# Altium PCB Relay-Driver-Board-v1.0.PcbDoc (part 1 of 3)
Units mil, origin at the board's own origin, x right, y up, seen from the top; angles counter-clockwise.
Board outline 3472 x 3047 mil, 4 copper layers (Top Layer, POWER, GND, Bottom Layer), stack 62.449 mil thick; 86 components, 50 nets, 261 pads, 281 vias.
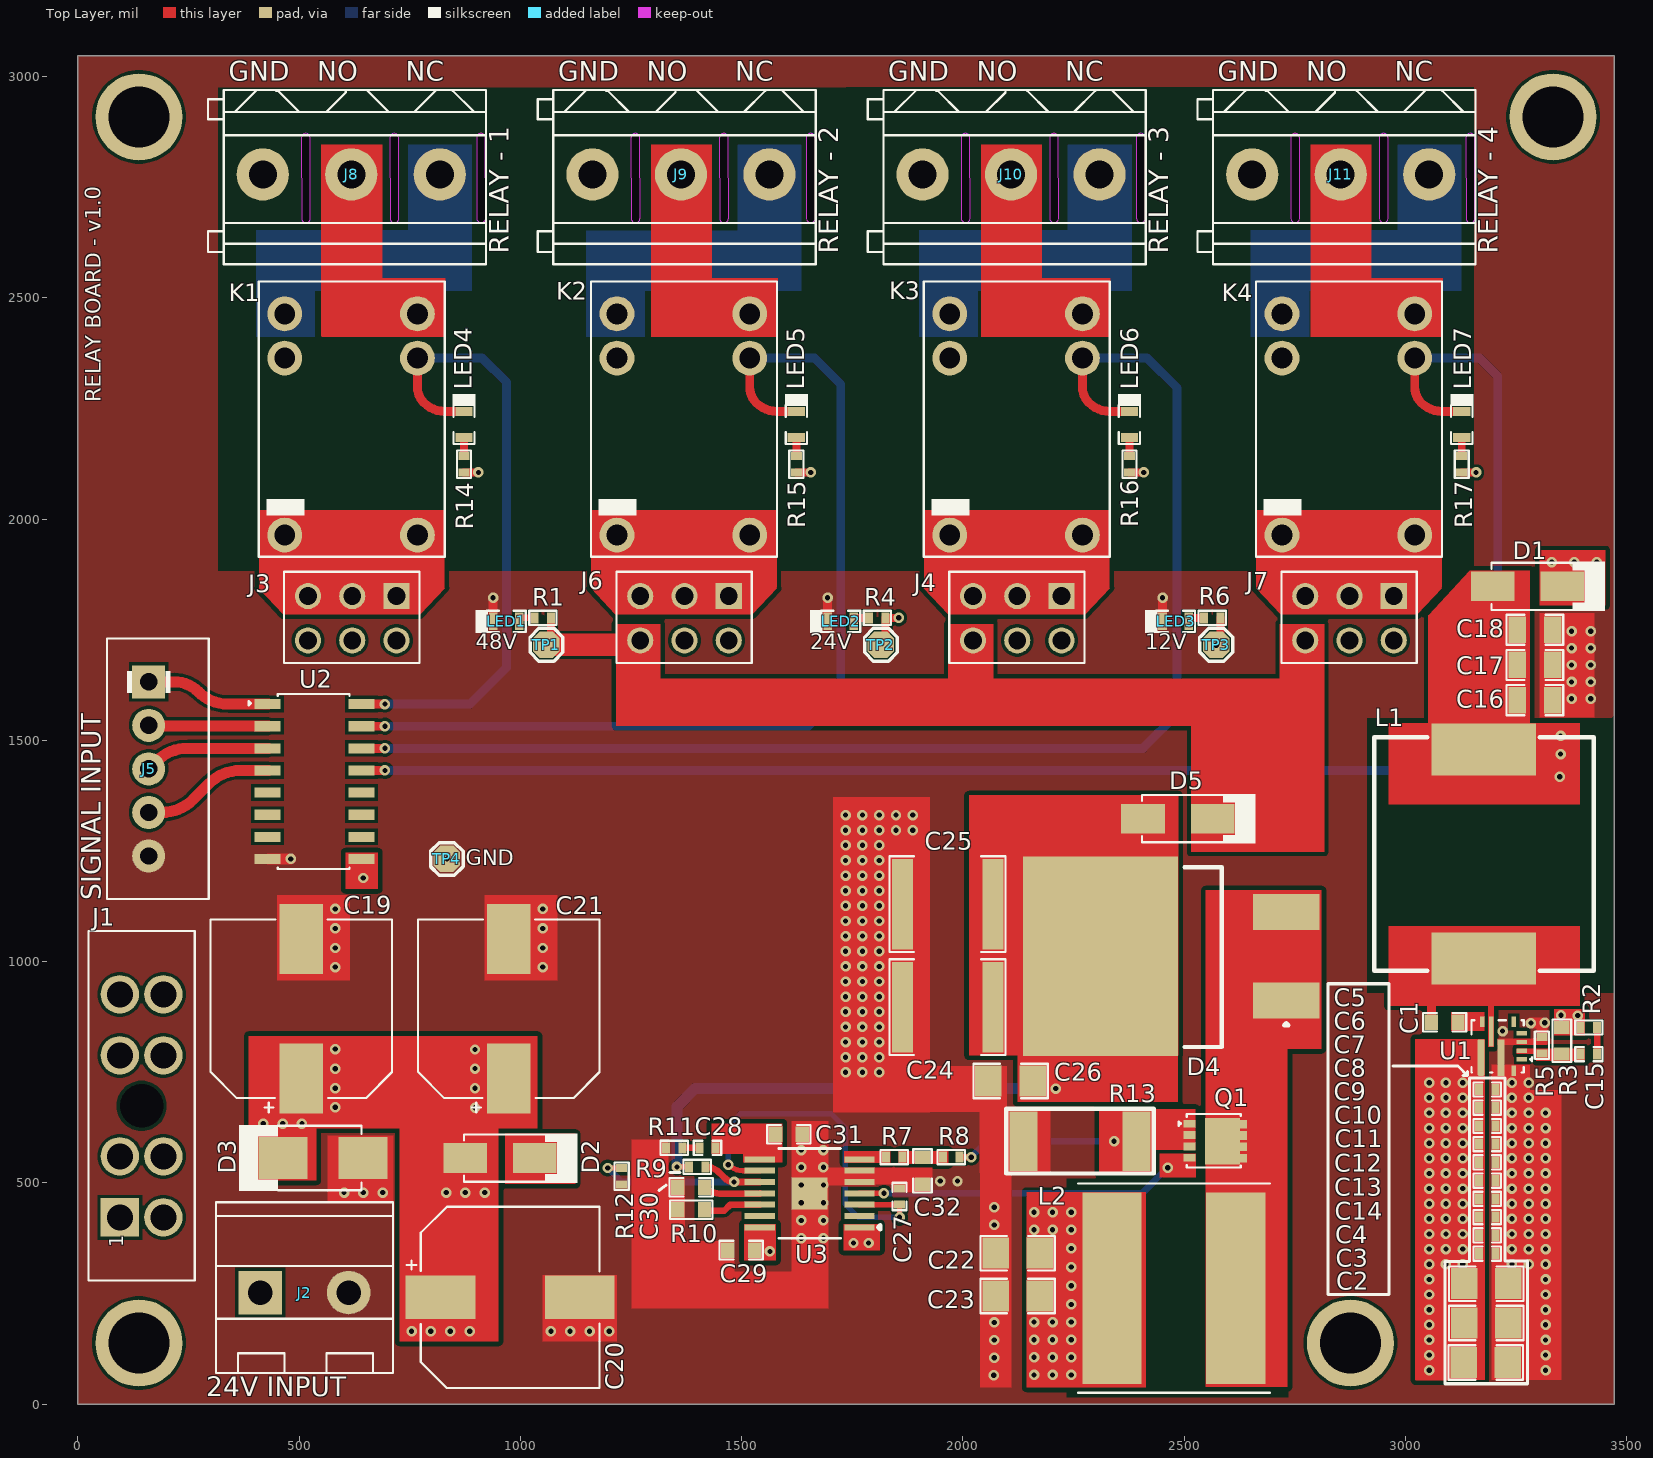
[diagram p0: Top Layer view]
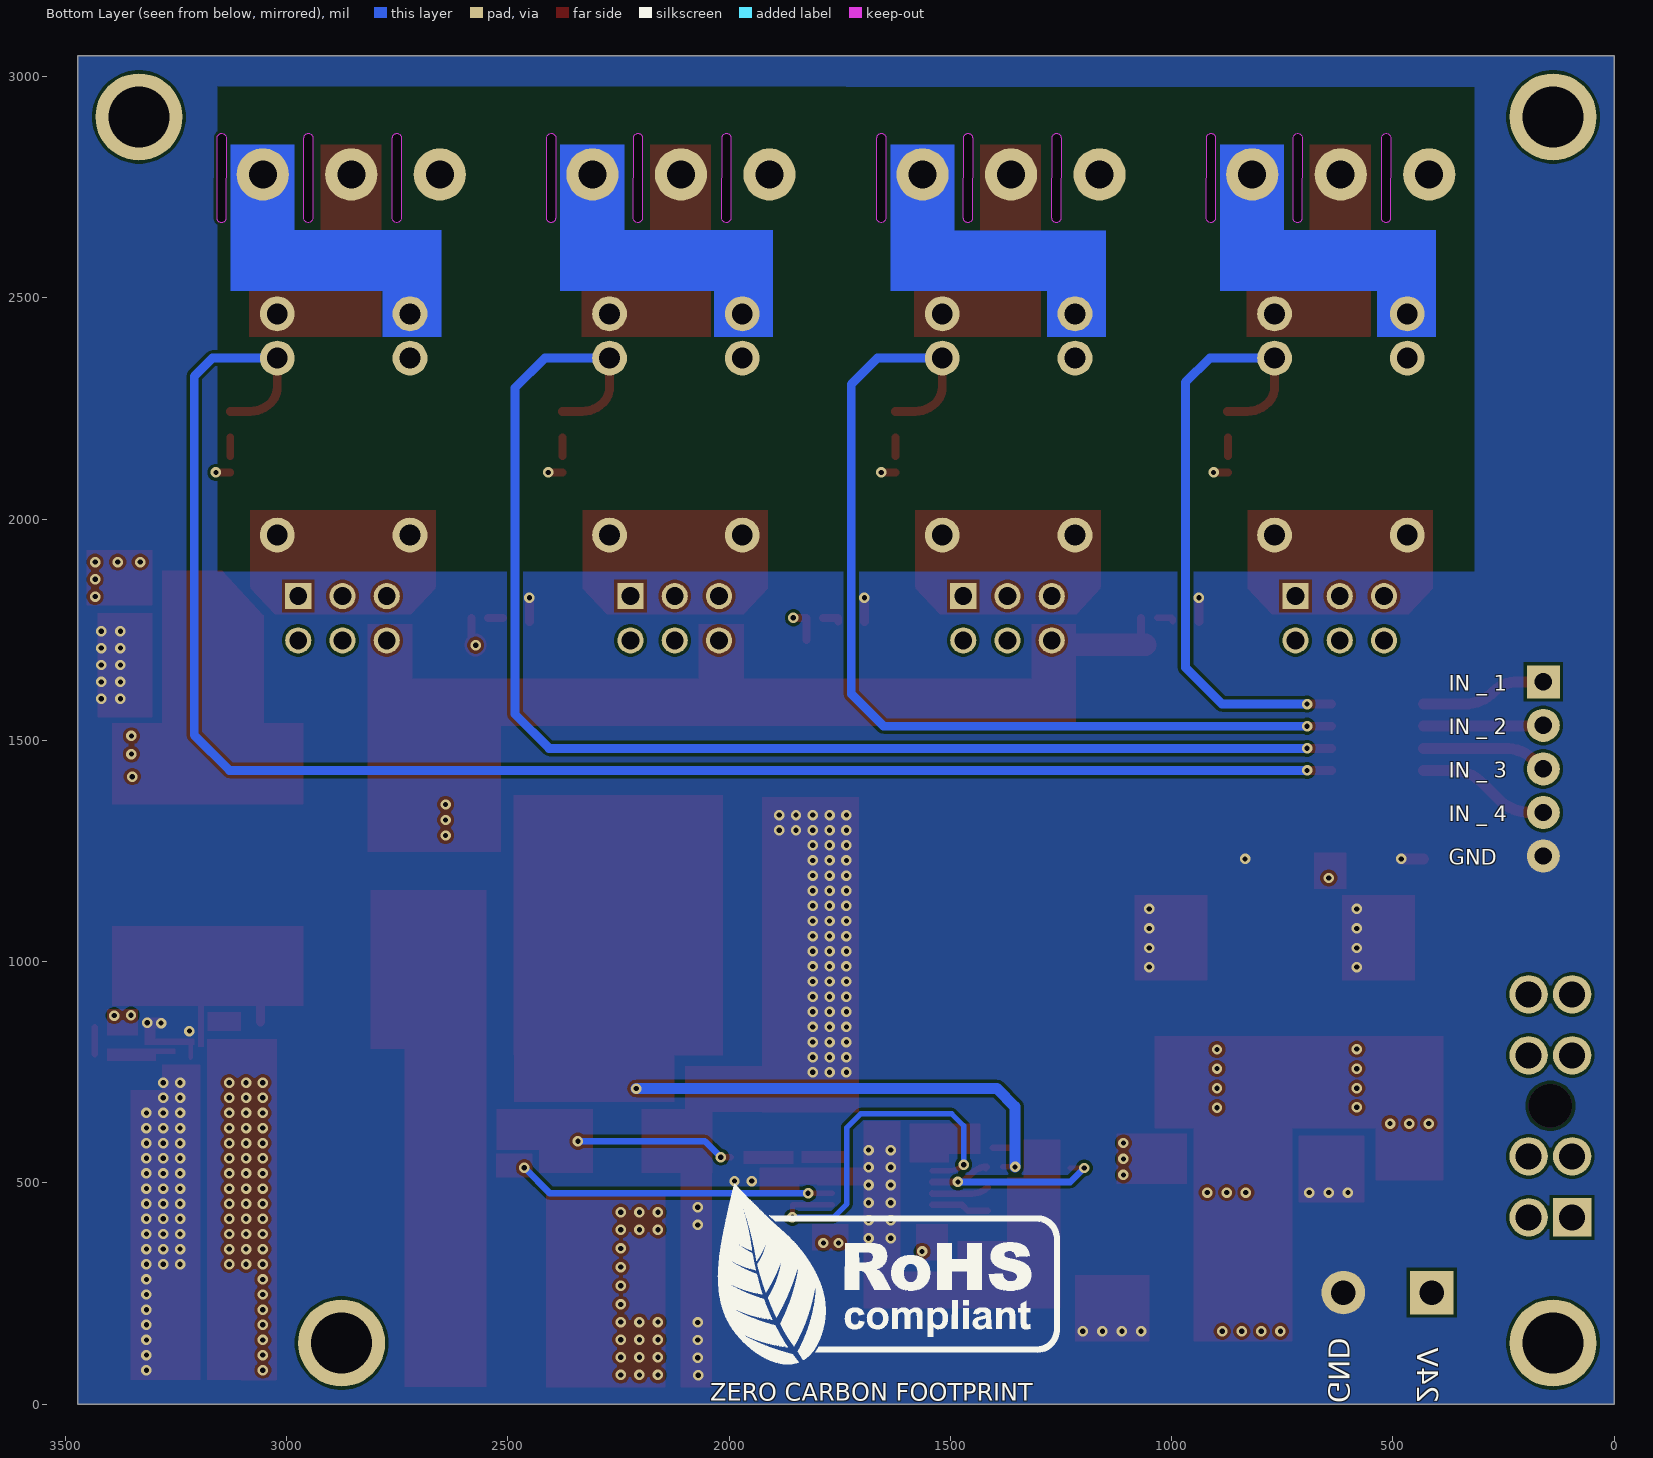
[diagram p1: Bottom Layer view, seen from below]
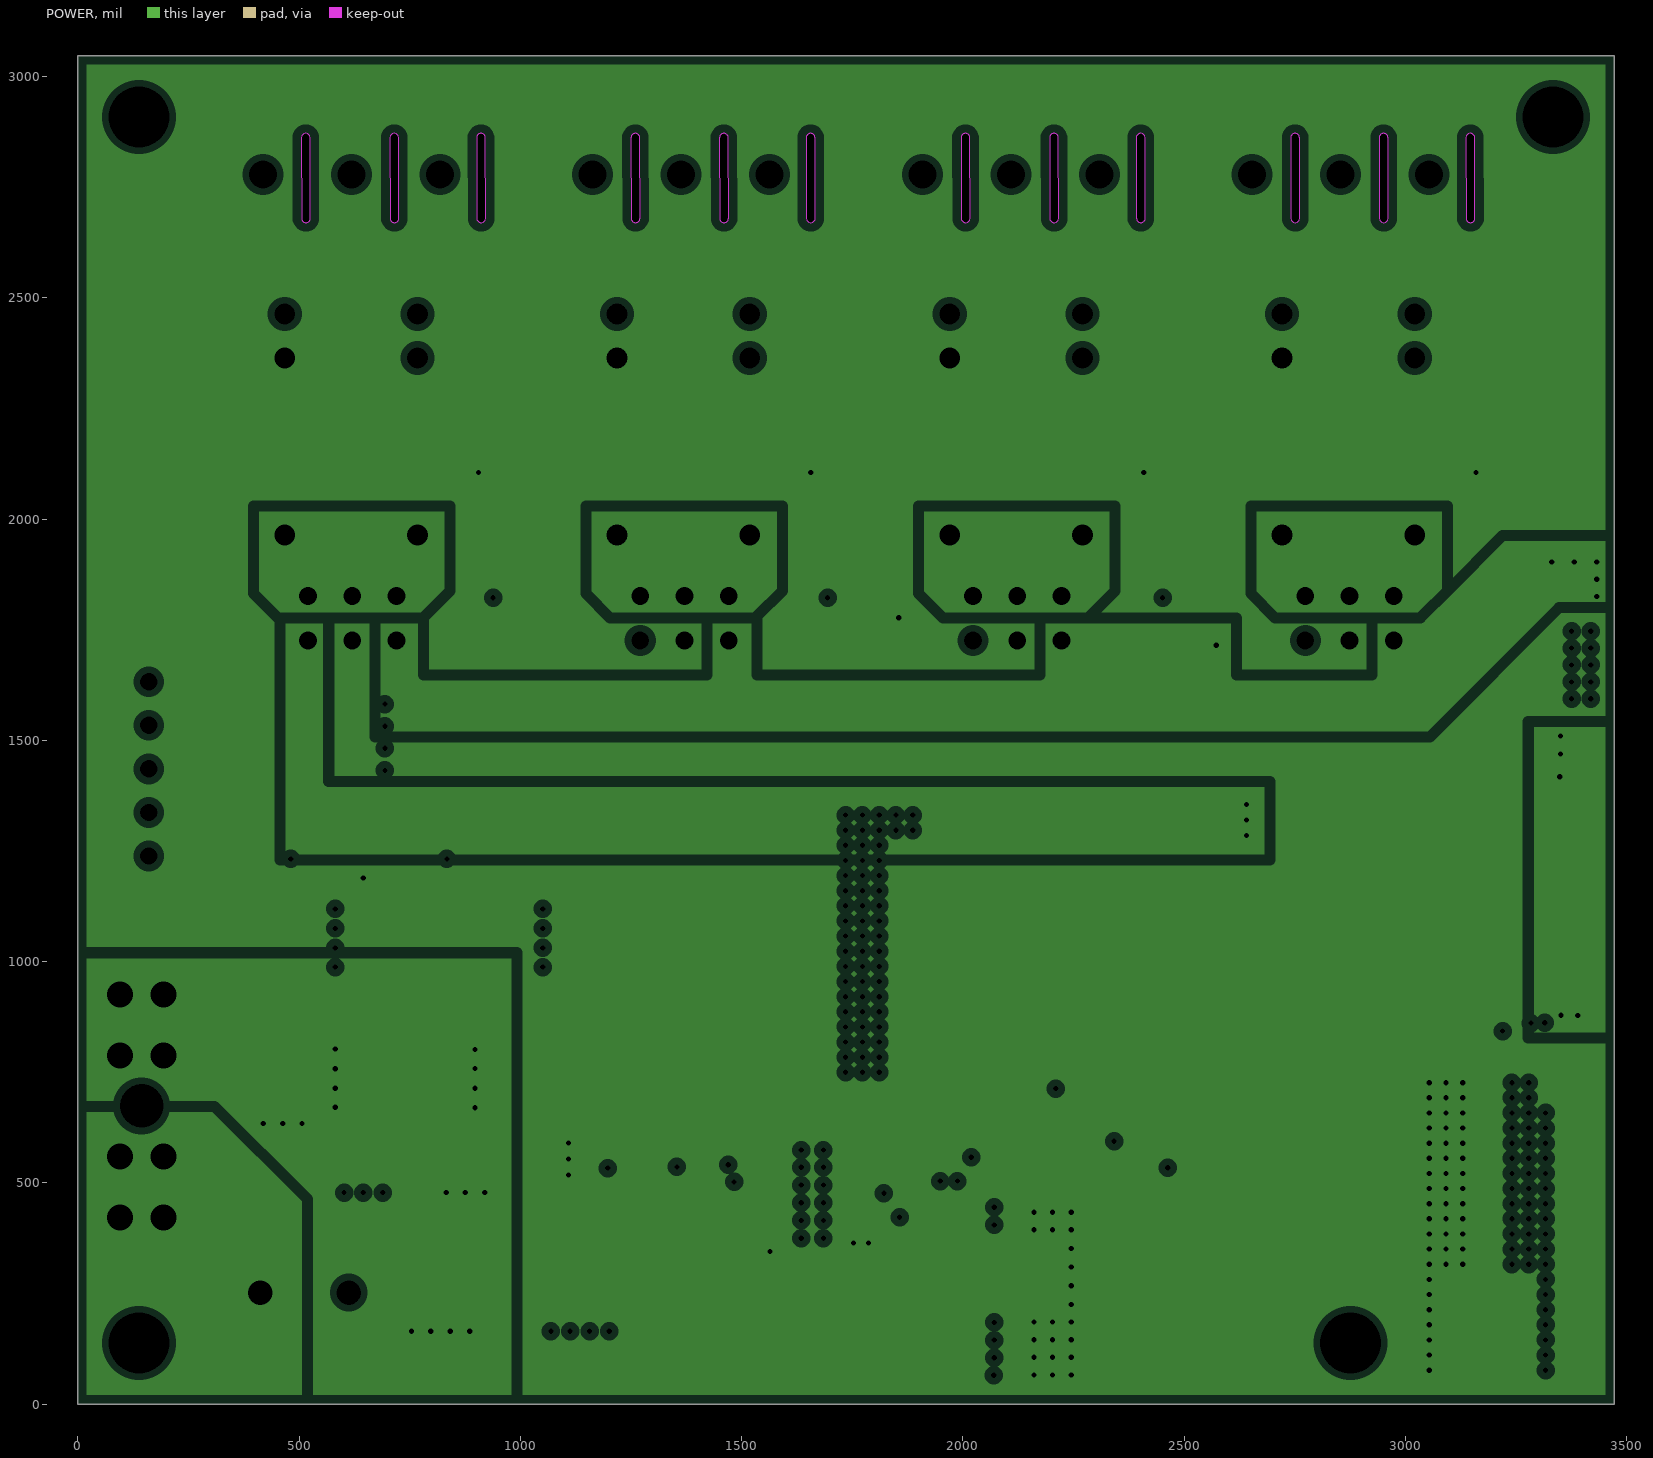
[diagram p2: POWER, clearances drawn from the general rule]
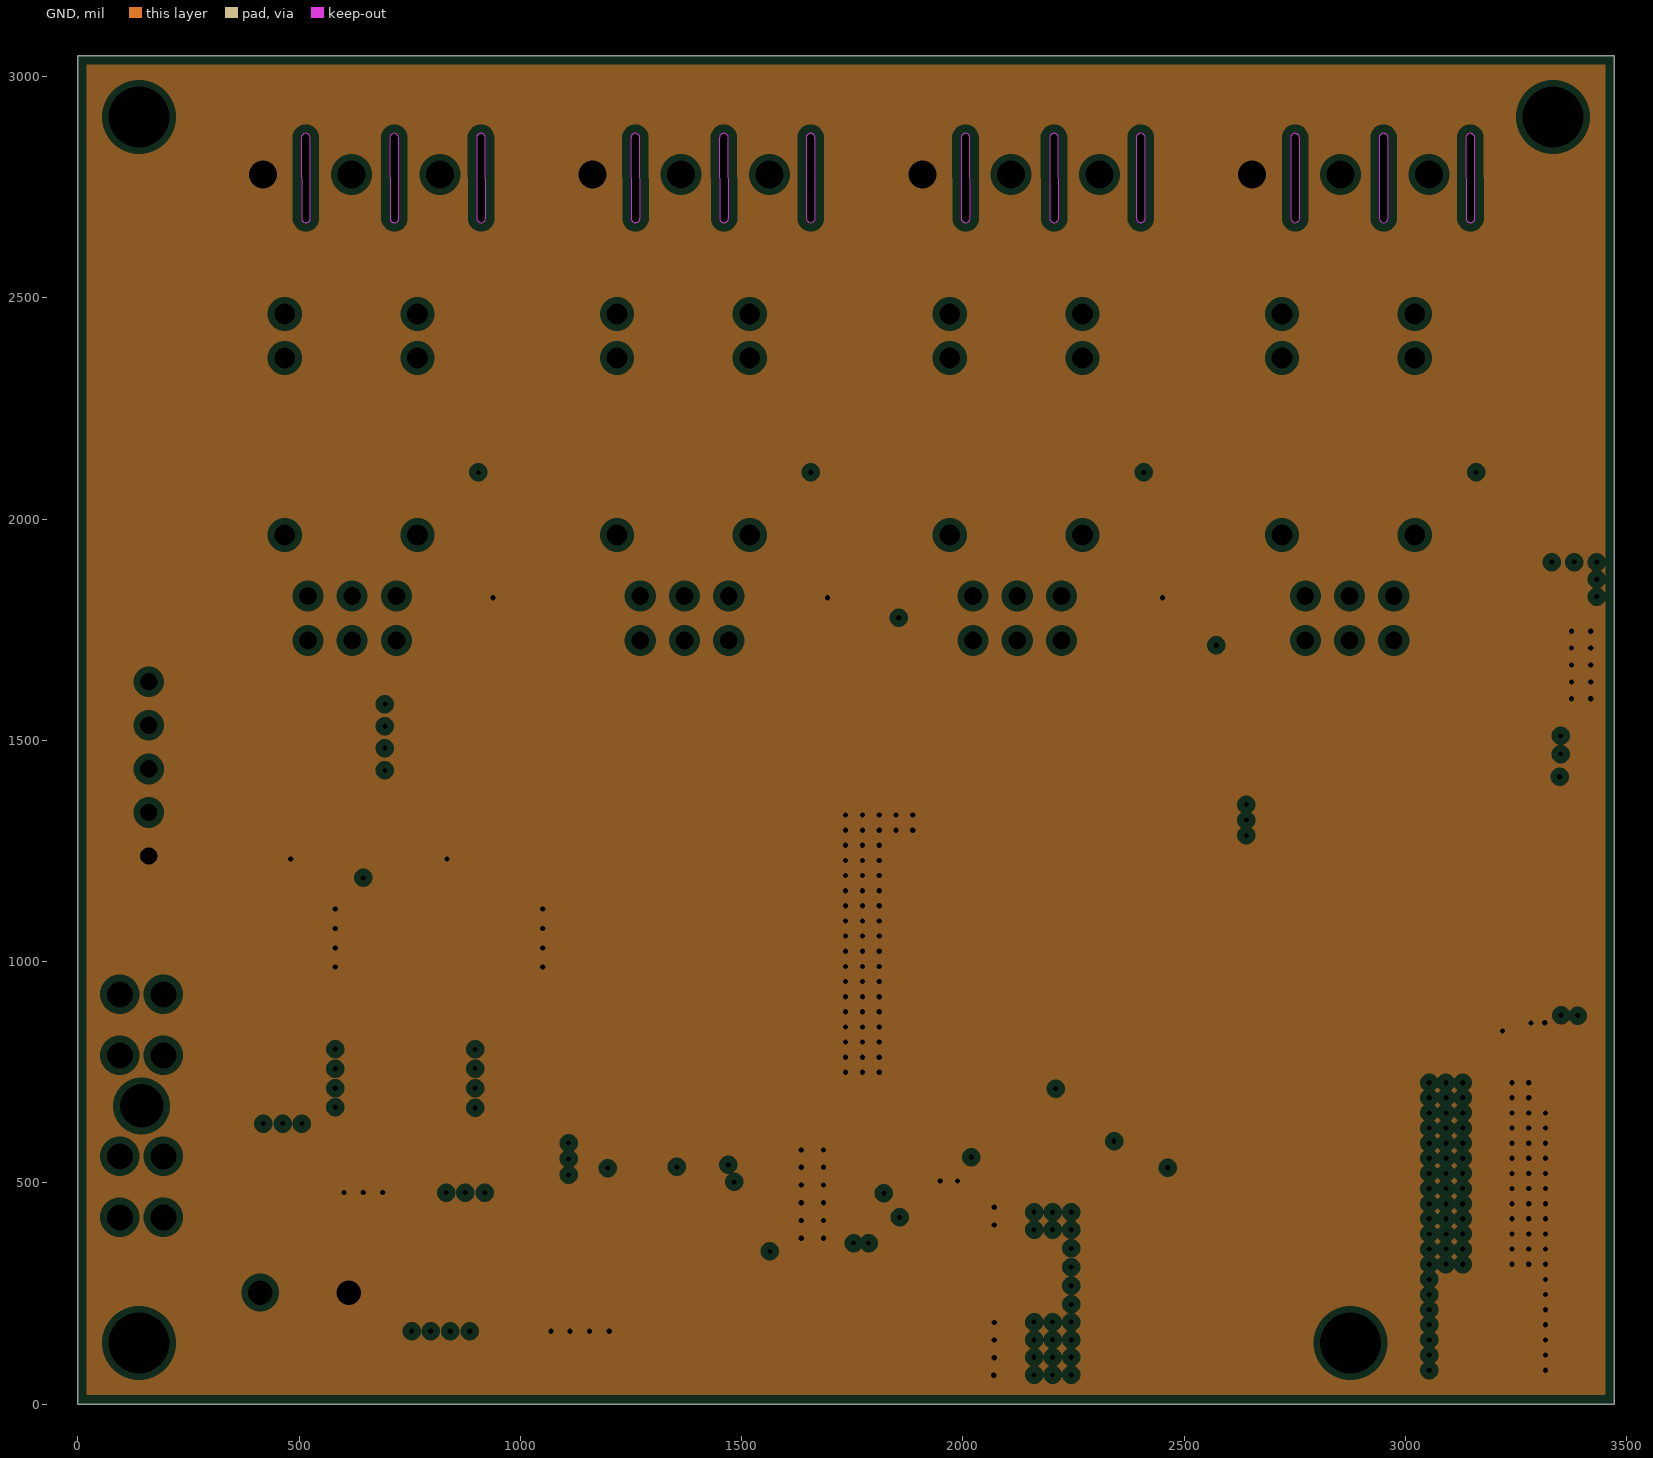
[diagram p3: GND, clearances drawn from the general rule]
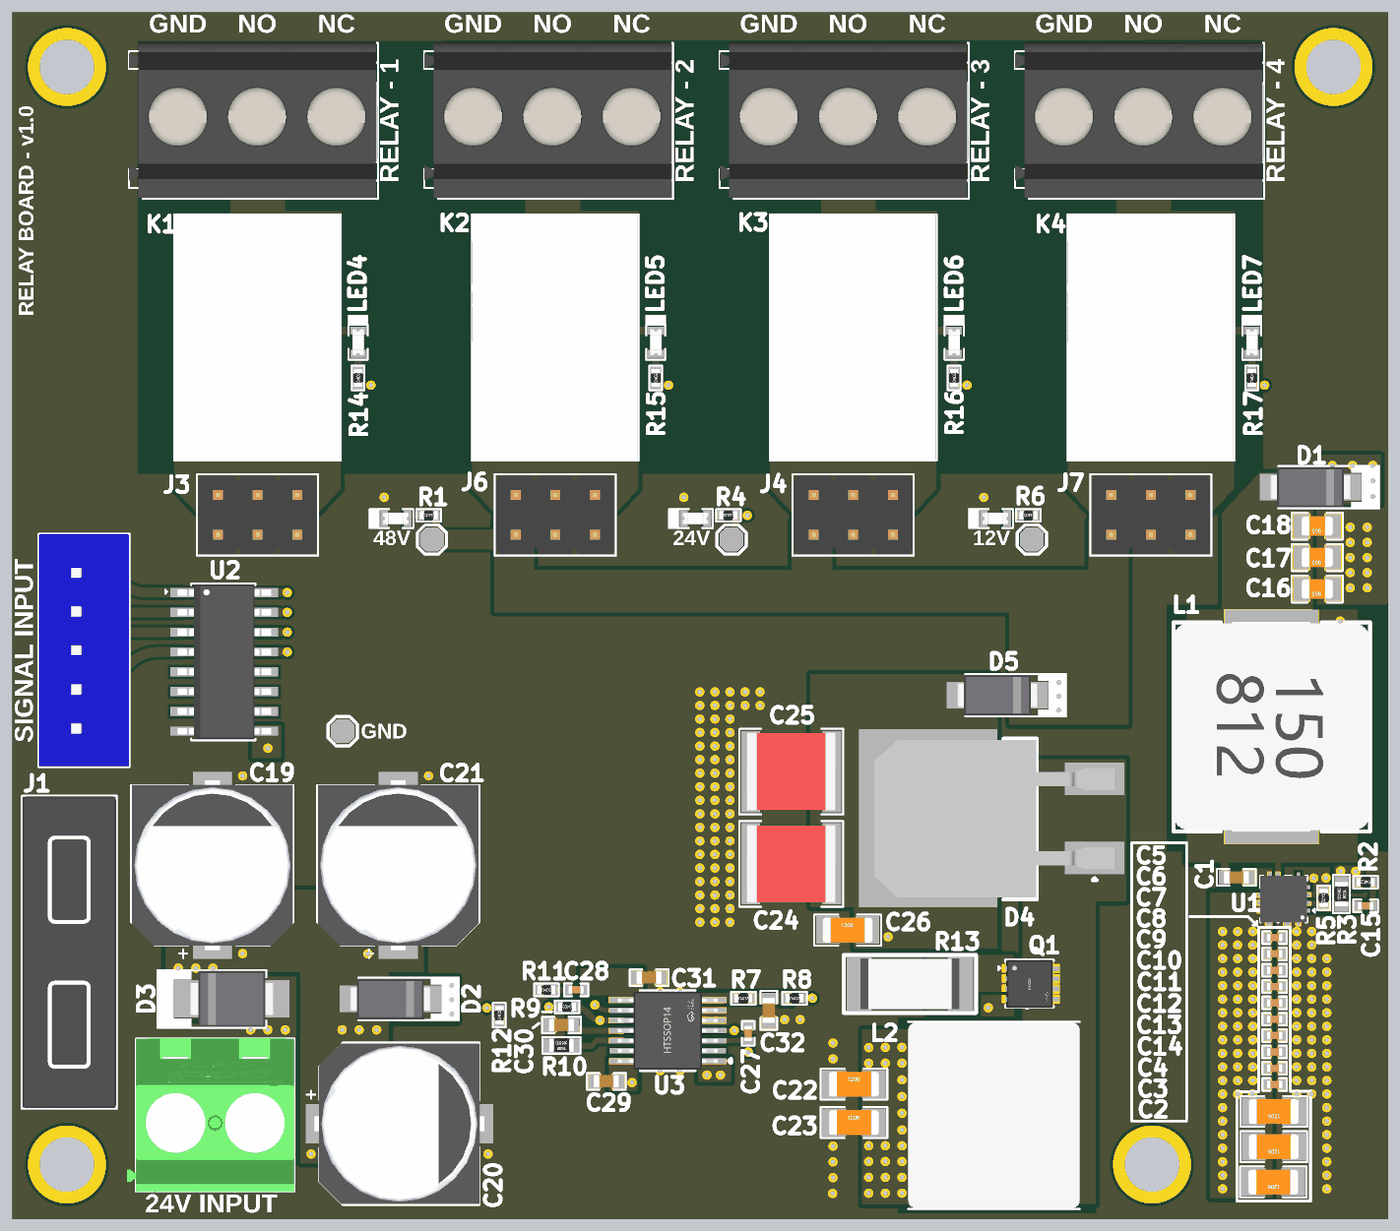
[diagram p5: 3D render of the assembled board from above, using the file's embedded part models]

## Layer stack, top to bottom
Top Solder: solder mask 0.394, Solder Resist, Dk 3.5
Top Layer: signal copper 1.378
Dielectric 2: prepreg 8.284, PP-006, Dk 4.1
POWER: plane copper 0.598, net +24V
Dielectric 1: core 41.929, FR-4, Dk 4.6
GND: plane copper 0.598, net GND
Dielectric 3: prepreg 8.284, PP-006, Dk 4.1
Bottom Layer: signal copper 1.378
Bottom Solder: solder mask 0.394, Solder Resist, Dk 3.5

## Board outline
0,0 0,3047 3472,3047 3472,0
cut-out: 3137.44,2679.97 ccw(c3147.44,2679.97) 3147.44,2669.97 ccw(c3147.44,2679.97) 3157.44,2679.97 3157.07,2862 3157,2862 ccw(c3147,2862) 3147,2872 ccw(c3147,2862) 3137,2862 3137.07,2862
cut-out: 2392.44,2679.97 ccw(c2402.44,2679.97) 2402.44,2669.97 ccw(c2402.44,2679.97) 2412.44,2679.97 2412.07,2862 2412,2862 ccw(c2402,2862) 2402,2872 ccw(c2402,2862) 2392,2862 2392.07,2862
cut-out: 1646.44,2679.97 ccw(c1656.44,2679.97) 1656.44,2669.97 ccw(c1656.44,2679.97) 1666.44,2679.97 1666.07,2862 1666,2862 ccw(c1656,2862) 1656,2872 ccw(c1656,2862) 1646,2862 1646.07,2862
cut-out: 901.44,2679.97 ccw(c911.44,2679.97) 911.44,2669.97 ccw(c911.44,2679.97) 921.44,2679.97 921.07,2862 921,2862 ccw(c911,2862) 911,2872 ccw(c911,2862) 901,2862 901.07,2862
cut-out: 2941.44,2679.97 ccw(c2951.44,2679.97) 2951.44,2669.97 ccw(c2951.44,2679.97) 2961.44,2679.97 2961.07,2862 2961,2862 ccw(c2951,2862) 2951,2872 ccw(c2951,2862) 2941,2862 2941.07,2862
cut-out: 2741.44,2679.97 ccw(c2751.44,2679.97) 2751.44,2669.97 ccw(c2751.44,2679.97) 2761.44,2679.97 2761.07,2862 2761,2862 ccw(c2751,2862) 2751,2872 ccw(c2751,2862) 2741,2862 2741.07,2862
cut-out: 2196.44,2679.97 ccw(c2206.44,2679.97) 2206.44,2669.97 ccw(c2206.44,2679.97) 2216.44,2679.97 2216.07,2862 2216,2862 ccw(c2206,2862) 2206,2872 ccw(c2206,2862) 2196,2862 2196.07,2862
cut-out: 1996.44,2679.97 ccw(c2006.44,2679.97) 2006.44,2669.97 ccw(c2006.44,2679.97) 2016.44,2679.97 2016.07,2862 2016,2862 ccw(c2006,2862) 2006,2872 ccw(c2006,2862) 1996,2862 1996.07,2862
cut-out: 1450.44,2679.97 ccw(c1460.44,2679.97) 1460.44,2669.97 ccw(c1460.44,2679.97) 1470.44,2679.97 1470.07,2862 1470,2862 ccw(c1460,2862) 1460,2872 ccw(c1460,2862) 1450,2862 1450.07,2862
cut-out: 1250.44,2679.97 ccw(c1260.44,2679.97) 1260.44,2669.97 ccw(c1260.44,2679.97) 1270.44,2679.97 1270.07,2862 1270,2862 ccw(c1260,2862) 1260,2872 ccw(c1260,2862) 1250,2862 1250.07,2862
cut-out: 505.44,2679.97 ccw(c515.44,2679.97) 515.44,2669.97 ccw(c515.44,2679.97) 525.44,2679.97 525.07,2862 525,2862 ccw(c515,2862) 515,2872 ccw(c515,2862) 505,2862 505.07,2862
cut-out: 705.44,2679.97 ccw(c715.44,2679.97) 715.44,2669.97 ccw(c715.44,2679.97) 725.44,2679.97 725.07,2862 725,2862 ccw(c715,2862) 715,2872 ccw(c715,2862) 705,2862 705.07,2862

## Design rules (kind name [scope] priority, off if disabled: settings)
Clearance [All] p1: gap=7 ignorepadtopadclearanceinfootprint=FALSE except(10: Fill-Poly Poly-Poly)
ComponentClearance [All] p1: gap=5 collisioncheckmode=3 verticalgap=5 showdistances=FALSE
HoleSize [All] p1: absolutevalues=TRUE maxlimit=1000 minlimit=1 maxpercent=80.000 minpercent=20.000
HoleToHoleClearance [All] p1: gap=1 allowstackedmicrovias=TRUE
MinimumSolderMaskSliver [All] p1: minsoldermaskwidth=0
PlaneClearance [All] p1: clearance=15
PlaneConnect [All] p1: planeconnectstyle=Relief reliefexpansion=10 reliefentries=4 reliefconductorwidth=10 reliefairgap=10
PolygonConnect [All] p1: connectstyle=Direct reliefconductorwidth=10 reliefentries=4 polygonreliefangle="90 Angle" airgapwidth=10
RoutingVias [All] p1: holewidth=11.81 width=23.62 viastyle="Through Hole" minholewidth=11.81 minwidth=23.62 maxholewidth=11.81 maxwidth=23.62
SilkToSilkClearance [All] p1: silktosilkclearance=0
SilkToSolderMaskClearance [IsPad] p1: minsilkscreentomaskgap=0 clearancetoexposedcopper=TRUE
SolderMaskExpansion SolderMaskExpansion_1 [IsVia] p1: expansion=0 istentingtop=FALSE soldermaskfromhole=TRUE
SolderMaskExpansion [Not IsVia] p2: expansion=4 istentingtop=FALSE
UnRoutedNet [All] p1: checkbadconnections=TRUE
Width [All] p1: maxlimit=100 minlimit=8 preferedwidth=12 minimp=50.000000 maximp=50.000000 favimp=50.000000
21 further rules are at their usual default settings.

## Components (designator, comment, footprint, x,y, rotation, side; value= is the part's Value field where it differs from the comment)
C1 "100nF" Cap-0603 3089,863 r0 top locked
C2 "4.7uF" Cap-1206 3182,94 r180 top locked
C3 "4.7uF" Cap-1206 3183,183 r180 top locked
C4 "4.7uF" Cap-1206 3183,272 r180 top locked
C5 "10nF" Cap-0402 3185.5,711 r180 top locked
C6 "10nF" Cap-0402 3185.5,669.78 r180 top locked
C7 "10nF" Cap-0402 3185.5,628.56 r180 top locked
C8 "10nF" Cap-0402 3185.5,587.33 r180 top locked
C9 "10nF" Cap-0402 3185.5,546.11 r180 top locked
C10 "10nF" Cap-0402 3185.5,504.89 r180 top locked
C11 "10nF" Cap-0402 3185.5,463.67 r180 top locked
C12 "10nF" Cap-0402 3185.5,422.44 r180 top locked
C13 "10nF" Cap-0402 3185.5,381.22 r180 top locked
C14 "10nF" Cap-0402 3185.5,340 r180 top locked
C15 "100pF" Cap-0402 3415,791 r0 top locked
C16 "22uF" Cap-0805 3293,1591 r180 top locked
C17 "22uF" Cap-0805 3293,1670.5 r180 top locked
C18 "22uF" Cap-0805 3293,1750 r180 top locked
C19 "220uF" UCD-220uF-10mmDia 505,893.48 r90 top locked
C20 "220uF" UCD-220uF-10mmDia 977,241 r0 top locked
C21 "220uF" UCD-220uF-10mmDia 974,893.48 r90 top locked
C22 "4.7uF" Cap-1206 2124,341.02 r0 top locked
C23 "4.7uF" Cap-1206 2124,244.02 r0 top locked
C24 "22uF" "Cap 2220" 1965.64,897.02 r0 top locked
C25 "22uF" "Cap 2220" 1965.64,1130.02 r0 top locked
C26 "1uF" Cap-1206 2108,730.02 r0 top locked
C27 "1uF" Cap-0402 1857,469.02 r270 top locked
C28 "47nF" Cap-0402 1423,579.02 r0 top locked
C29 "100nF" Cap-0603 1499,348 r180 top locked
C30 "100nF" Cap-0603 1386,490.02 r180 top locked
C31 "100nF" Cap-0603 1607,610 r0 top locked
C32 "1nF" Cap-0603 1909,527.02 r90 top locked
D1 "SS56" SMA 3276,1848 r180 top locked
D2 "SS56" SMA 954,556 r180 top locked
D3 "SMBJ28A-13-F" SMB_ 554,556 r180 top locked value=330pF
D4 "STPS20M100SG-TR" D2Pak. 2521.04,1012.02 r90 top locked
D5 "SS56" SMA 2486,1323.02 r180 top locked
J1 "178.6165.0002" 178.6165.0002 144,674 r90 top locked
J2 "1715721" 1715721 512,252 r0 top
J3 "PH-01291" PH-01291 620,1776 r180 top locked
J4 "PH-01291" PH-01291 2123,1776 r180 top locked
J5 "B5B-XH-A(LF)(SN)" B5B-XH-A(LF)(SN)_ 160,1435.5 r270 top locked
J6 "PH-01291" PH-01291 1371,1776 r180 top locked
J7 "PH-01291" PH-01291 2874,1776 r180 top locked
J8 "DB128L-5.08-3P-BK-S" DB128L-5.08-3P-BK-S 618,2779 r180 top
J9 "DB128L-5.08-3P-BK-S" DB128L-5.08-3P-BK-S 1363,2779 r180 top
J10 "DB128L-5.08-3P-BK-S" DB128L-5.08-3P-BK-S 2109,2779 r180 top
J11 "DB128L-5.08-3P-BK-S" DB128L-5.08-3P-BK-S 2854,2779 r180 top
K1 "HFD16/24-ZFH-3N" HFD16/24-ZFH-3N 617.42,2214 r90 top locked
K2 "HFD16/24-ZFH-3N" HFD16/24-ZFH-3N 1368.42,2214 r90 top locked
K3 "HFD16/24-ZFH-3N" HFD16/24-ZFH-3N 2120.42,2214 r90 top locked
K4 "HFD16/24-ZFH-3N" HFD16/24-ZFH-3N 2871.42,2214 r90 top locked
L1 "6.8uH" MWSA1206S-6R8MT 3177,1243.22 r90 top locked
L2 "15uH" FEXL1010A-150M 2477,262.02 r0 top locked
LED1 "RED" LED-0603 968,1769 r180 top locked
LED2 "RED" LED-0603 1724,1769 r180 top locked
LED3 "RED" LED-0603 2481,1769 r180 top locked
LED4 "Blue" LED-0603 872.67,2214 r90 top locked
LED5 "Blue" LED-0603 1623.67,2214 r90 top locked
LED6 "Blue" LED-0603 2376.67,2214 r90 top locked
LED7 "Blue" LED-0603 3127.67,2214 r90 top locked
Q1 "CSD19538Q3A" VSONP-8(3.1x3.1) 2570.99,594.52 r0 top locked
R1 "7.5K" Res-0402 1051,1777 r180 top locked
R2 "20K" Res-0402 3415,851 r180 top locked value=20kR
R3 "196K" Res-0603 3354,821 r90 top locked value=196kR
R4 "3.9K" Res-0402 1807,1777 r180 top locked value=3.9kR
R5 "10K" Res-0402 3309,811 r270 top locked
R6 "1.5K" Res-0402 2564,1777 r180 top locked
R7 "511R" Res-0402 1845,558.02 r0 top locked
R8 "100R" Res-0402 1974,558.02 r0 top locked
R9 "120K" Res-0402 1400,536.02 r180 top locked
R10 "48.7K" Res-0603 1386,439.02 r0 top locked
R11 "2.94K" Res-0402 1348,579.02 r0 top locked
R12 "2.49K" Res-0402 1229,515 r90 top locked value=2.49kR
R13 "8mR" RES-2512 2264.95,594.02 r0 top locked
R14 "3.3K" Res-0402 872.67,2124 r90 top locked
R15 "3.3K" Res-0402 1623.67,2124 r90 top locked
R16 "3.3K" Res-0402 2376.67,2124 r90 top locked
R17 "3.3K" Res-0402 3127.67,2124 r90 top locked
TP1 "TEST POINT" Test-point 1059,1716 r90 top locked
TP2 "TEST POINT" Test-point 1815,1716 r90 top locked
TP3 "TEST POINT" Test-point 2573,1716 r90 top locked
TP4 "TEST POINT" Test-point 834,1232 r90 top
U1 "TPS56637RPAR" "10-VQFN-HR (3x3)" 3217.43,808.54 r180 top locked
U2 "ULN2003AIDR" "16-SOIC (0.154\", 3.90MM WIDTH)" 535,1407 r0 top locked
U3 "LM5156HPWPR" HTSSOP-14-EP 1653.82,476.25 r180 top locked

## Footprints (in the part's own frame and the unit in brackets; to place one, negate y for a bottom-side part, rotate by r counter-clockwise, add the part's x,y. Pads: shape width x height; smd on the part's side, far side on the other; paste and mask are expansions set on the pad)
"10-VQFN-HR (3x3)" [mm]
  rect 0.6x0.25 smd paste+0 mask+0.07: 1(-1.175,0.75) 2(-1.175,0.25) 3(-1.175,-0.25) 4(-1.175,-0.75)
  rect 0.25x0.6 smd paste+0 mask+0.07: 5(-0.705,-1.4) 7(1.095,-1.4) 10(-0.705,1.4)
  rect 0.25x1.7 smd paste+0 mask+0.07: 6(0.595,-0.85)
  rrect50% 0.4x2.1 smd mask+0.07: 8(1.175,0.65)
  rect 0.4x2.1 smd paste+0 mask+0.07: 9(0.015,0.65)
  Top Layer region: 287 vertices and 0 holes, not listed, extent 0.975,-0.4 1.936,1.7
  silkscreen extent -1.76,-1.5 1.73,1.5, body extent -1.27,-1.5 1.73,1.5, height 1
"16-SOIC (0.154\", 3.90MM WIDTH)" [mm]
  rect 1.5x0.58 smd: 1(-2.7,4.445) 2(-2.7,3.175) 3(-2.7,1.905) 4(-2.7,0.635) 5(-2.7,-0.635) 6(-2.7,-1.905) 7(-2.7,-3.175) 8(-2.7,-4.445) 9(2.7,-4.445) 10(2.7,-3.175) 11(2.7,-1.905) 12(2.7,-0.635) 13(2.7,0.635) 14(2.7,1.905) 15(2.7,3.175) 16(2.7,4.445)
  silkscreen extent -3.78,-5.03 2,5.03, body extent -3,-4.95 3,4.95, height 1.75
178.6165.0002 [mm]
  rect 2.2x2.2 hole 1.5 paste-2539.97 mask+0.051: 1(-6.4,1.25)
  round 2.2 hole 1.5 paste-2539.97 mask+0.051: 2(-2.9,1.25) 3(2.9,1.25) 4(6.4,1.25) 5(6.4,-1.25) 6(2.9,-1.25) 7(-2.9,-1.25) 8(-6.4,-1.25)
  round 0 hole 2.5 unplated paste-2539.97: ""(0,0)
  silkscreen extent -10.03,-3.05 10.03,3.05, body extent -10,-3 10,3, height 17.5
1715721 [mm]
  rect 2.5x2.5 hole 1.4 paste+0 mask+0.051: 1(-2.54,0)
  round 2.5 hole 1.4 paste+0 mask+0.051: 2(2.54,0)
  silkscreen extent -5.08,-4.62 5.08,5.18, body extent -5.64,-4.62 5.09,5.21, height 14.2
B5B-XH-A(LF)(SN)_ [mm] "XH Header Male Pin 0.098\"(2.50mm) 5 Through Hole,P=2.5mm Wire To Board / Wire To Wire Connector RoHS"
  rect 1.9x1.9 hole 1: 1(-5,0)
  round 1.9 hole 1: 2(-2.5,0) 3(0,0) 4(2.5,0) 5(5,0)
  silkscreen extent -7.49,-2.39 7.47,3.45, body extent -7.45,-2.34 7.45,3.41, height 7
"Cap 2220" [mm]
  rect 1.2x5.2 smd: 1(-2.6,0) 2(2.6,0)
  silkscreen extent -3.33,-2.75 3.33,2.75, body extent -2.85,-2.5 2.85,2.5, height 2.24
Cap-0402 [mil]
  rect 18x25 smd mask+2.36: 1(-18.5,0) 2(18.5,0)
  silkscreen extent -31,-16 31,16, body extent -20,-10 20,10, height 19
Cap-0603 [mil]
  rect 30x35 smd mask+2.36: 1(-30,0) 2(30,0)
  silkscreen extent -49,-21 49,21, body extent -32,-16 31,16, height 34
Cap-0805 [mil] "SMD 0805"
  rect 40x60 smd mask+2.76: 1(-40,0) 2(40,0)
  silkscreen extent -64,-34 64,34, body extent -39,-25 39,25, height 30
Cap-1206 [mil] "SMD 1206"
  rect 60x70 smd: 1(-50,0) 2(50,0)
  silkscreen extent -84,-39 84,39, body extent -63,-31 63,32, height 39
D2Pak. [mm]
  rect 2.08x3.81 smd: 1(-2.54,-5.335) 2(2.54,-5.335)
  rect 11.43x8.89 smd: 3(0,5.335)
  silkscreen extent -5.21,-5.46 5.11,0.51, body extent -5.08,-6.6 5.02,8.79, height 4.5
DB128L-5.08-3P-BK-S [mm]
  round 3 hole 1.6 paste+0 mask+0.051: 1(-5.08,0) 2(0,0) 3(5.08,0)
  silkscreen extent -7.73,-4.85 8.22,5.15, body extent -7.62,-4.9 8.22,5.1, height 14
FEXL1010A-150M [mm]
  rect 3.4x11 smd: 1(-3.55,0) 2(3.55,0)
  silkscreen extent -5.5,-6 5.5,6, body extent -5.5,-5.95 5.5,5.95, height 7.7
HFD16/24-ZFH-3N [mm]
  round 2 hole 1.2 paste+0 mask+0.051: 1(-6.35,3.81) 2(3.81,3.81) 3(6.35,3.81) 4(6.35,-3.81) 5(3.81,-3.81) 6(-6.35,-3.81)
  silkscreen extent -7.6,-5.38 8.2,5.3, body extent -7.55,-5.3 8.15,5.31, height 11.8
HTSSOP-14-EP [mm]
  rect 1.731x0.343 smd paste+0 mask+0.051: 1(-2.866,1.95) 2(-2.866,1.3) 3(-2.866,0.65) 4(-2.866,0) 5(-2.866,-0.65) 6(-2.866,-1.3) 7(-2.866,-1.95) 8(2.866,-1.95) 9(2.866,-1.3) 10(2.866,-0.65) 11(2.866,0) 12(2.866,0.65) 13(2.866,1.3) 14(2.866,1.95)
  rect 2.055x1.83 smd paste+0 mask+0.051: 15(0,0)
  silkscreen extent -4.06,-2.58 1.77,2.58, body extent -3.2,-2.49 3.2,2.49, height 1.3
LED-0603 [mm]
  rect 0.5x1 smd: 1(-0.75,0) 2(0.75,0)
  silkscreen extent -1.12,-0.66 1.75,0.66, body extent -0.82,-0.37 0.82,0.36, height 0.68
MWSA1206S-6R8MT [mm]
  rect 3x6 smd paste+0 mask+0.051: 1(-6,0) 2(6,0)
  silkscreen extent -6.71,-6.33 6.69,6.28, body extent -6.73,-6.3 6.73,6.3, height 4.81
PH-01291 [mm]
  rect 1.5x1.5 hole 1.02: 1(-2.54,-1.27)
  round 1.5 hole 1.02: 2(-2.54,1.27) 3(0,-1.27) 4(0,1.27) 5(2.54,-1.27) 6(2.54,1.27)
  silkscreen extent -3.86,-2.66 3.91,2.56, body extent -3.79,-2.59 3.83,2.49, height 8.27
Res-0402 [mil]
  rect 18x25 smd mask+2.17: 1(-18.5,0) 2(18.5,0)
  silkscreen extent -32,-17 32,16, body extent -23,-11 23,11, height 16
Res-0603 [mil]
  rect 30x35 smd: 1(-30,0) 2(30,0)
  silkscreen extent -48,-21 48,21, body extent -31,-17 31,17, height 18
RES-2512 [mm]
  rect 1.6x3.4 smd: 1(-3.25,0) 2(3.25,0)
  silkscreen extent -4.24,-1.85 4.24,1.85, body extent -3.17,-1.63 3.18,1.63, height 0.58
SMA [mm]
  rect 2.5x1.7 smd: 1(-2,0) 2(2,0)
  silkscreen extent -4.45,-1.42 2.06,1.42, body extent -2.6,-1.3 2.6,1.3, height 2.4
SMB_ [mm]
  rect 2.8x2.4 smd: 1(-2.3,0) 2(2.3,0)
  silkscreen extent -2.21,-1.9 4.83,1.91, body extent -2.7,-1.8 2.7,1.8, height 2.3
Test-point [mil]
  oct 60x60 smd: 1(0,0)
  silkscreen extent -37,-37 37,37
UCD-220uF-10mmDia [mm] "0.406\" L x 0.406\" W (10.30mm x 10.30mm)"
  rect 4x2.5 smd: 1(-4,0) 2(4,0)
  silkscreen extent -5.95,-5.21 5.13,5.21, body extent -5.45,-5.15 5.45,5.15, height 10.8
VSONP-8(3.1x3.1) [mm]
  rect 0.68x0.45 smd paste-100 mask+0.05: 1(-1.498,0.988) 2(-1.498,0.338) 3(-1.498,-0.313) 4(-1.498,-0.962)
  rect 0.6x0.5 smd paste-100 mask+0.05: 5(1.498,-0.988) 6(1.498,-0.338) 7(1.498,0.312) 8(1.498,0.962)
  rect 2x2.65 smd paste-100 mask+0.05: ""(0.407,-0.013)
  silkscreen extent -2.1,-1.52 1.45,1.55, body extent -1.61,-1.66 1.41,1.64, height 0.81

## Part data
C1 C29 C30 C31: library part CC0603KRX5R9BB104, "CAP CER 0.1UF 50V X5R 0603", Case Code (Imperial)=0603, Case Code (Metric)=1608, Dielectric=X5R, LCSC Part Number=C110022, Manufacturer=Yageo, Max Operating Temperature=85°C, Min Operating Temperature=-55°C, Package Quantity=4000, Supplier Part Number 1=311-4046-1-ND, Tolerance=10%, Voltage Rating=50V, Capacitance=100nF, Case/Package=0603, Category="Ceramic Capacitors", ComponentLink1Description=http://www.mouser.com/ds/2/447/Yageo_UPY-GP_NP0_16V-to-50V_9-358835.pdf?src-supplier=Mouser, ComponentLink1URL=http://www.mouser.com/ds/2/447/Yageo_UPY-GP_NP0_16V-to-50V_9-358835.pdf?src-supplier=Mouser, ComponentLink2Description=https://www.yageo.com/upload/media/product/productsearch/datasheet/mlcc/UPY-GPHC_X5R_4V-to-50V_26.pdf?src-supplier=Digi-Key, ComponentLink2URL=https://www.yageo.com/upload/media/product/productsearch/datasheet/mlcc/UPY-GPHC_X5R_4V-to-50V_26.pdf?src-supplier=Digi-Key, ComponentLink3Description=http://www.yageo.com/exep/pages/download/literatures/ProductSelectionGuide%202014_Final_2.pdf?src-supplier=Digi-Key, ComponentLink3URL=http://www.yageo.com/exep/pages/download/literatures/ProductSelectionGuide%202014_Final_2.pdf?src-supplier=Digi-Key, Halogen Free="Halogen Free", Item Type=Capacitor, Lead Free="Lead Free", Length=0.063inch, Manufacturer Part Number=CC0603KRX5R9BB104, Mount="Surface Mount", Packaging="Tape and Reel", Pricing 1="1=0.10000, 10=0.05200, 50=0.02820, 100=0.02310, 500=0.01648, 1000=0.01294 (USD)", RoHS=Yes, Stock 1=152253, Supplier 1=Digi-Key, Termination=SMD/SMT, Thickness=0.035inch, Voltage Rating (DC)=50V, Weight=7.1E-05oz, Width=0.031inch
C2 C3 C4 C22 C23: library part CL31A475KB9LNNC, "CAP CER 4.7UF 50V X5R 1206", Case Code (Imperial)=1206, Case Code (Metric)=3216, Case/Package=Ceramic, Dielectric=X5R, LCSC Part Number=C318753, Manufacturer=Samsung, Max Operating Temperature=85°C, Min Operating Temperature=-55°C, Package Quantity=1, Tolerance=10%, Voltage Rating=50V, Category="Ceramic Capacitors", ComponentLink1Description=https://datasheet.ciiva.com/25727/cl31a475kb9lnnc-25727168.pdf?src-supplier=Digi-Key, ComponentLink1URL=https://datasheet.ciiva.com/25727/cl31a475kb9lnnc-25727168.pdf?src-supplier=Digi-Key, ComponentLink2Description=https://datasheet.ciiva.com/26838/getdatasheetpartid-359646-26838869.pdf?src-supplier=Verical, ComponentLink2URL=https://datasheet.ciiva.com/26838/getdatasheetpartid-359646-26838869.pdf?src-supplier=Verical, Depth=1.6mm, Item Type=Capacitor, Length=3.2mm, Manufacturer Part Number=CL31A475KB9LNNC, Mounting Technology="Surface Mount", Packaging="Tape and Reel", Pricing="4000=0.09189, 8000=0.08978, 16000=0.08767, 24000=0.08555, 32000=0.08344 (USD)", Radiation Hardening=No, RoHS=Yes, RoHS Compliant=Yes, Series=CL, Stock=176000, Supplier=Avnet, Supplier Part Number=CL31A475KB9LNNC, Thickness=0.039inch, Width=0.063inch
C5 C6 C7 C8 C9 C10 C11 C12 C13 C14: library part CC0402KRX7R9BB103, "CAP CER 10000PF 50V X7R 0402", Case Code (Imperial)=0402, Case Code (Metric)=1005, Dielectric=X7R, LCSC Part Number=C60133, Manufacturer=Yageo, Max Operating Temperature=125°C, Min Operating Temperature=-55°C, Package Quantity=1, Resistor Type=Ceramic, Tolerance=10%, Voltage=50V, Capacitance=10nF, Case/Package=0402, Category="Ceramic Capacitors", ComponentLink1Description=https://datasheet.ciiva.com/11788/0900766b8079c870-11788375.pdf?src-supplier=RSComponents, ComponentLink1URL=https://datasheet.ciiva.com/11788/0900766b8079c870-11788375.pdf?src-supplier=RSComponents, ComponentLink2Description=https://datasheet.ciiva.com/26862/getdatasheetpartid-138248-26862642.pdf?src-supplier=Verical, ComponentLink2URL=https://datasheet.ciiva.com/26862/getdatasheetpartid-138248-26862642.pdf?src-supplier=Verical, ComponentLink3Description=https://datasheet.ciiva.com/7978/1489800-7978093.pdf?src-supplier=Element14, ComponentLink3URL=https://datasheet.ciiva.com/7978/1489800-7978093.pdf?src-supplier=Element14, ComponentLink4Description=https://datasheet.ciiva.com/28450/1489800-28450377.pdf?src-supplier=Element14, ComponentLink4URL=https://datasheet.ciiva.com/28450/1489800-28450377.pdf?src-supplier=Element14, ComponentLink5Description=https://datasheet.ciiva.com/176/mlccorderingcode-176349.pdf?src-supplier=Digi-Key, ComponentLink5URL=https://datasheet.ciiva.com/176/mlccorderingcode-176349.pdf?src-supplier=Digi-Key, ComponentLink6Description=https://datasheet.ciiva.com/176/mlccorderingcode-176348.pdf?src-supplier=Digi-Key, ComponentLink6URL=https://datasheet.ciiva.com/176/mlccorderingcode-176348.pdf?src-supplier=Digi-Key, ComponentLink7Description=https://datasheet.ciiva.com/176/mlccorderingcode-176350.pdf?src-supplier=Digi-Key, ComponentLink7URL=https://datasheet.ciiva.com/176/mlccorderingcode-176350.pdf?src-supplier=Digi-Key, Depth=0.5mm, Halogen Free="Halogen Free", Height=0.5mm, Item Type=Capacitor, Lead Free="Lead Free", Length=1mm, Manufacturer Part Number=CC0402KRX7R9BB103, Mount="Surface Mount", Packaging="Tape and Reel", Pricing 1="10000=0.00178 (USD)", Radiation Hardening=No, Reach SVHC Compliant=Yes, RoHS=Yes, RoHS Compliant=Yes, Series=CC, Stock 1=995000, Supplier 1=Avnet, Supplier Part Number 1=CC0402KRX7R9BB103, Termination=SMD/SMT, Thickness=0.022inch, Voltage Rating=50V, Voltage Rating (DC)=50V, Width=0.02inch
C15: library part CC0402JRNPO9BN101, "CAP CER 100PF 50V C0G/NPO 0402", Case Code (Imperial)=0402, Case Code (Metric)=1005, Dielectric=C0G, Dielectric Material=Ceramic, Insulation Resistance=100GR, LCSC Part Number=C106200, Manufacturer=Yageo, Max Operating Temperature=125°C, Min Operating Temperature=-55°C, Package Quantity=1, Supplier Part Number=8934564, Temperature Coefficient=30ppm/°C, Tolerance=5%, Voltage=50V, Case/Package=0402, Category="Ceramic Capacitors", ComponentLink1Description=https://datasheet.ciiva.com/11786/0900766b80d84fbf-11786101.pdf?src-supplier=Rs, ComponentLink1URL=https://datasheet.ciiva.com/11786/0900766b80d84fbf-11786101.pdf?src-supplier=Rs, ComponentLink2Description=https://datasheet.ciiva.com/23767/25787-23767888.pdf?src-supplier=Newark, ComponentLink2URL=https://datasheet.ciiva.com/23767/25787-23767888.pdf?src-supplier=Newark, ComponentLink3Description=https://datasheet.ciiva.com/28450/1443161-28450220.pdf?src-supplier=Element14, ComponentLink3URL=https://datasheet.ciiva.com/28450/1443161-28450220.pdf?src-supplier=Element14, ComponentLink4Description=https://datasheet.ciiva.com/8033/1443161-8033598.pdf?src-supplier=Element14, ComponentLink4URL=https://datasheet.ciiva.com/8033/1443161-8033598.pdf?src-supplier=Element14, ComponentLink5Description=https://datasheet.ciiva.com/143/mlccorderingcode-143990.pdf?src-supplier=Digi-Key, ComponentLink5URL=https://datasheet.ciiva.com/143/mlccorderingcode-143990.pdf?src-supplier=Digi-Key, ComponentLink6Description=https://datasheet.ciiva.com/143/mlccorderingcode-143989.pdf?src-supplier=Digi-Key, ComponentLink6URL=https://datasheet.ciiva.com/143/mlccorderingcode-143989.pdf?src-supplier=Digi-Key, ComponentLink7Description=https://datasheet.ciiva.com/143/mlccorderingcode-143991.pdf?src-supplier=Digi-Key, ComponentLink7URL=https://datasheet.ciiva.com/143/mlccorderingcode-143991.pdf?src-supplier=Digi-Key, Depth=0.5mm, Height=0.5mm, Item Type=Capacitor, Lead Free="Lead Free", Length=1mm, Manufacturer Part Number=CC0402JRNPO9BN101, Mounting Technology="Surface Mount", Packaging="Tape and Reel", Pins=2, Pricing="10000=0.002, 40000=0.0019, 150000=0.0018, 400000=0.0018, 1000000=0.0017 (USD)", Radiation Hardening=No, Reach SVHC Compliant=No, RoHS=Yes, RoHS Compliant=Yes, Series=CC, Stock=11720000, Supplier="Future Electronics", Termination=SMD/SMT, Thickness=0.022inch, Voltage Rating=50V, Voltage Rating (DC)=50V, Width=0.02inch
C16 C17 C18: library part CC0805MKX5R8BB226, "CAP CER 22UF 25V X5R 0805", Case Code (Imperial)=0805, Case Code (Metric)=2012, Dielectric=X5R, LCSC Part Number=C784585, Manufacturer=Yageo, Max Operating Temperature=85°C, Min Operating Temperature=-55°C, Package Quantity=3000, Supplier Part Number 1=311-1903-1-ND, Tolerance=20%, Voltage Rating=25V, Capacitance=22uF, Case/Package=0805, Category="Ceramic Capacitors", ComponentLink1Description=http://www.mouser.com/ds/2/447/Yageo_UPY-GP_NP0_16V-to-50V_9-358835.pdf?src-supplier=Mouser, ComponentLink1URL=http://www.mouser.com/ds/2/447/Yageo_UPY-GP_NP0_16V-to-50V_9-358835.pdf?src-supplier=Mouser, ComponentLink2Description=http://www.yageo.com/documents/recent/UPY-GPHC_X5R_4V-to-50V_25.pdf?src-supplier=Digi-Key, ComponentLink2URL=http://www.yageo.com/documents/recent/UPY-GPHC_X5R_4V-to-50V_25.pdf?src-supplier=Digi-Key, Halogen Free="Halogen Free", Height=1.25mm, Item Type=Capacitor, Lead Free="Lead Free", Length=0.079inch, Manufacturer Part Number=CC0805MKX5R8BB226, Mount="Surface Mount", Packaging="Tape and Reel", Pricing 1="1=0.47000, 10=0.33300, 50=0.25140, 100=0.21900, 500=0.16222, 1000=0.13789 (USD)", RoHS=Yes, RoHS Compliant=Yes, Stock 1=64970, Supplier 1=Digi-Key, Termination=SMD/SMT, Thickness=0.057inch, Voltage Rating (DC)=25V, Weight=0.000194oz, Width=0.049inch
C19 C20 C21: library part UCD1H221MNL1GS, "CAP ALUM 220UF 20% 50V SMD", Case/Package=Radial, LCSC Part Number=C116211, Leakage Current=3uA, Manufacturer=Nichicon, Max Operating Temperature=105°C, Min Operating Temperature=-55°C, Package Quantity=1, Ripple Current=700mA, Supplier Part Number 1=493-6390-1-ND, Tolerance=20%, Voltage=50V, Capacitance=220uF, Category="Aluminum Electrolytic Capacitors", ComponentLink1Description=https://datasheet.ciiva.com/11776/0900766b80ebdadd-11776792.pdf?src-supplier=RSComponents, ComponentLink1URL=https://datasheet.ciiva.com/11776/0900766b80ebdadd-11776792.pdf?src-supplier=RSComponents, ComponentLink2Description=https://datasheet.ciiva.com/5362/e-cd-22158-5362489.pdf?src-supplier=Mouser, ComponentLink2URL=https://datasheet.ciiva.com/5362/e-cd-22158-5362489.pdf?src-supplier=Mouser, ComponentLink3Description=https://datasheet.ciiva.com/11684/e-cd-11684678.pdf?src-supplier=Avnet, ComponentLink3URL=https://datasheet.ciiva.com/11684/e-cd-11684678.pdf?src-supplier=Avnet, ComponentLink4Description=https://datasheet.ciiva.com/15037/e-cd-15037119.pdf?src-supplier=Digi-Key, ComponentLink4URL=https://datasheet.ciiva.com/15037/e-cd-15037119.pdf?src-supplier=Digi-Key, ComponentLink5Description=https://datasheet.ciiva.com/16393/e-cd-16393493.pdf?src-supplier=Future+Electronics, ComponentLink5URL=https://datasheet.ciiva.com/16393/e-cd-16393493.pdf?src-supplier=Future+Electronics, ComponentLink6Description=https://datasheet.ciiva.com/17354/e-cd-17354606.pdf?src-supplier=Avnet+Europe, ComponentLink6URL=https://datasheet.ciiva.com/17354/e-cd-17354606.pdf?src-supplier=Avnet+Europe, Construction=Cylindrical, Diameter=10mm, Dissipation Factor=0.1%, Features="General Purpose", Height=10mm, Height - Seated (Max)=0.394inch, Impedance=160mR, Item Type=Capacitor, Lead Free="Lead Free", Length=10mm, Life (Hours)=5000Hour, Manufacturer Part Number=UCD1H221MNL1GS, Mount="Surface Mount,PCB", Packaging="Tape and Reel", Pricing 1="1=0.85000, 10=0.60200, 50=0.45480, 100=0.39620 (USD)", Radiation Hardening=No, RoHS=Yes, RoHS Compliant=Yes, Series=CD, Supplier 1=Digi-Key, Termination=SMD/SMT, Voltage Rating=50V, Voltage Rating (DC)=50V
C24 C25: library part FS55X226K101LRG, "100V 22uF X7R ±10% 2220 Multilayer Ceramic Capacitors MLCC - SMD/SMT ROHS", LCSC Part Number=C7499406, Manufacturer=PSA, Package=2220, ComponentLink1Description=LCSC, ComponentLink1URL=https://www.lcsc.com/product-detail/Multilayer-Ceramic-Capacitors-MLCC-SMD-SMT_PSA-Prosperity-Dielectrics-FS55X226K101LRG_C7499406.html, Item Type=Capacitor, Manufacturer Part Number=FS55X226K101LRG
C26: library part GRM31CR72A105KA01K, "CAP CER 1UF 100V X7R 1206", Case Code (Imperial)=1206, Case Code (Metric)=3216, Dielectric=X7R, LCSC Part Number=C909823, Manufacturer=Murata, Max Operating Temperature=125°C, Min Operating Temperature=-55°C, Package Quantity=1, Supplier Part Number 1=490-6523-1-ND, Tolerance=10%, Voltage Rating=100V, Capacitance=1uF, Case/Package=1206, Category="Ceramic Capacitors", ComponentLink1Description=https://datasheet.ciiva.com/11616/product-11616604.pdf?src-supplier=Avnet, ComponentLink1URL=https://datasheet.ciiva.com/11616/product-11616604.pdf?src-supplier=Avnet, ComponentLink2Description=https://datasheet.ciiva.com/6264/partnumbering-e-01-6264397.pdf?src-supplier=Digi-Key, ComponentLink2URL=https://datasheet.ciiva.com/6264/partnumbering-e-01-6264397.pdf?src-supplier=Digi-Key, ComponentLink3Description=https://datasheet.ciiva.com/6264/partnumbering-e-01-6264398.pdf?src-supplier=Digi-Key, ComponentLink3URL=https://datasheet.ciiva.com/6264/partnumbering-e-01-6264398.pdf?src-supplier=Digi-Key, ComponentLink4Description=https://datasheet.ciiva.com/6264/partnumbering-e-01-6264399.pdf?src-supplier=Digi-Key, ComponentLink4URL=https://datasheet.ciiva.com/6264/partnumbering-e-01-6264399.pdf?src-supplier=Digi-Key, Construction=Flat, Depth=1.6mm, Height=1.6mm, Length=3.2mm, Manufacturer Part Number=GRM31CR72A105KA01K, Mount="Surface Mount", Packaging="Tape and Reel", Pricing 1="1=0.48000, 10=0.33000, 50=0.23100, 100=0.19800, 500=0.14850, 1000=0.12540, 2500=0.11880 (USD)", Radiation Hardening=No, RoHS=Yes, RoHS Compliant=Yes, Series=GRM, Stock 1=11842, Supplier 1=Digi-Key, Termination=SMD/SMT, Thickness=0.071inch, Voltage Rating (DC)=100V, Width=1.6mm
C27: library part CC0402KRX5R8BB105, "CAP CER 1UF 25V X5R 0402", Case Code (Imperial)=0402, Case Code (Metric)=1005, Dielectric=X5R, LCSC Part Number=C326568, Manufacturer=Yageo, Max Operating Temperature=85°C, Min Operating Temperature=-55°C, Package Quantity=10000, Supplier Part Number 1=603-CC402KRX5R8BB105, Tolerance=10%, Voltage Rating=25V, Capacitance=1uF, Case/Package=0402, Category="Ceramic Capacitors", ComponentLink1Description=http://www.mouser.com/ds/2/447/Yageo_UPY-GP_NP0_16V-to-50V_9-358835.pdf?src-supplier=Mouser, ComponentLink1URL=http://www.mouser.com/ds/2/447/Yageo_UPY-GP_NP0_16V-to-50V_9-358835.pdf?src-supplier=Mouser, ComponentLink2Description=http://www.yageo.com/documents/recent/UPY-GPHC_X5R_4V-to-50V_25.pdf?src-supplier=Digi-Key, ComponentLink2URL=http://www.yageo.com/documents/recent/UPY-GPHC_X5R_4V-to-50V_25.pdf?src-supplier=Digi-Key, ComponentLink3Description=https://4donline.ihs.com/images/VipMasterIC/IC/YAGO/YAGO-S-A0006851646/YAGO-S-A0006851646-1.pdf?hkey=6D3A4C79FDBF58556ACFDE234799DDF0&src-supplier=Newark, ComponentLink3URL=https://4donline.ihs.com/images/VipMasterIC/IC/YAGO/YAGO-S-A0006851646/YAGO-S-A0006851646-1.pdf?hkey=6D3A4C79FDBF58556ACFDE234799DDF0&src-supplier=Newark, Halogen Free="Halogen Free", Lead Free="Lead Free", Length=0.039inch, Manufacturer Part Number=CC0402KRX5R8BB105, Mount="Surface Mount", Packaging="Tape and Reel", Pricing 1="1=0.30000, 10=0.20400, 50=0.20400, 100=0.11600, 1000=0.07200, 10000=0.05900 (USD)", RoHS=Yes, RoHS Compliant=Yes, Stock 1=91975, Supplier 1=Mouser, Termination=SMD/SMT, Thickness=0.022inch, Voltage Rating (DC)=25V, Weight=2.3E-05oz, Width=0.02inch
C28: library part CC0402KRX7R9BB473, "CAP CER 0.047UF 50V X7R 0402", Case Code (Imperial)=0402, Case Code (Metric)=1005, Dielectric=1511DielectricType, LCSC Part Number=C272875, Manufacturer=Yageo, Max Operating Temperature=125°C, Min Operating Temperature=-55°C, Supplier Part Number=2095687, Temperature Coefficient=30ppm/°C, Tolerance=10%, Voltage Rating=50V, Case/Package=0402, Category="Ceramic Capacitors", ComponentLink1Description=https://datasheet.octopart.com/CC0402KRX7R9BB473-Yageo-datasheet-166511530.pdf?src-supplier=Future+Electronics, ComponentLink1URL=https://datasheet.octopart.com/CC0402KRX7R9BB473-Yageo-datasheet-166511530.pdf?src-supplier=Future+Electronics, ComponentLink2Description=http://www.yageo.com/documents/recent/UPY-GPHC_X7R_6.3V-to-50V_18.pdf?src-supplier=Digikey, ComponentLink2URL=http://www.yageo.com/documents/recent/UPY-GPHC_X7R_6.3V-to-50V_18.pdf?src-supplier=Digikey, ComponentLink3Description=https://datasheet.octopart.com/CC0402KRX7R9BB473-Yageo-datasheet-140260305.pdf?src-supplier=Newark, ComponentLink3URL=https://datasheet.octopart.com/CC0402KRX7R9BB473-Yageo-datasheet-140260305.pdf?src-supplier=Newark, Halogen Free=5694HalogenFree, Height=550um, Item Type=Capacitor, Lead Free=5697LeadFree, Length=0.039inch, Manufacturer Part Number=CC0402KRX7R9BB473, Material=4241ConductorMaterial, Mounting Technology="Surface Mount", Packaging="Tape and Reel", Pricing="10000=0.0044, 40000=0.0042, 100000=0.004, 150000=0.0041, 250000=0.0039, 400000=0.0037, 500000=0.0038 (USD)", RoHS=Yes, RoHS Compliant=Yes, Series=CC, Stock=1130000, Supplier="Future Electronics", Thickness=0.022inch, Voltage Rating (DC)=50V, Width=0.02inch
C32: library part CL10B102KC8NNNC, "CAP CER 1nF 100V X7R 0603", Case Code (Imperial)=0603, Case Code (Metric)=1608, Dielectric=X7R, LCSC Part Number=C153291, Manufacturer=Samsung, Max Operating Temperature=125°C, Min Operating Temperature=-55°C, Package Quantity=1, Tolerance=10%, Voltage=100V, Capacitance=1nF, Case/Package=0603, Category="Ceramic Capacitors", ComponentLink1Description=https://datasheet.ciiva.com/25799/cl10b102kc8nnnc-25799476.pdf?src-supplier=Digi-Key, ComponentLink1URL=https://datasheet.ciiva.com/25799/cl10b102kc8nnnc-25799476.pdf?src-supplier=Digi-Key, ComponentLink2Description=https://datasheet.ciiva.com/29198/458286-da-01-en-vs-kondensator-0603-29198496.pdf?src-supplier=Conrad, ComponentLink2URL=https://datasheet.ciiva.com/29198/458286-da-01-en-vs-kondensator-0603-29198496.pdf?src-supplier=Conrad, ComponentLink3Description=https://datasheet.ciiva.com/26838/getdatasheetpartid-640779-26838395.pdf?src-supplier=Verical, ComponentLink3URL=https://datasheet.ciiva.com/26838/getdatasheetpartid-640779-26838395.pdf?src-supplier=Verical, ComponentLink4Description=https://datasheet.ciiva.com/26310/mlcc-catalogdownload2013-eng-26310266.pdf?src-supplier=Distrelec, ComponentLink4URL=https://datasheet.ciiva.com/26310/mlcc-catalogdownload2013-eng-26310266.pdf?src-supplier=Distrelec, ComponentLink5Description=https://datasheet.ciiva.com/16199/cl05b104kq5nnnc-16199246.pdf?src-supplier=Future+Electronics, ComponentLink5URL=https://datasheet.ciiva.com/16199/cl05b104kq5nnnc-16199246.pdf?src-supplier=Future+Electronics, Construction=Flat, Contact Plating=Tin, Depth=0.8mm, Height=0.8mm, Lead Free="Lead Free", Length=1.6mm, Manufacturer Part Number=CL10B102KC8NNNC, Material=Ceramic, Mount="Surface Mount", Packaging="Tape and Reel", Pricing 1="4000=0.00988, 8000=0.00987, 16000=0.00986, 24000=0.00985, 32000=0.00984, 40000=0.00982, 400000=0.00981 (USD)", Radiation Hardening=No, RoHS=Yes, RoHS Compliant=Yes, Series=CL, Stock 1=184000, Supplier 1=Avnet, Supplier Part Number 1=CL10B102KC8NNNC, Thickness=0.035inch, Voltage Rating=100V, Voltage Rating (DC)=100V, Width=0.031inch
D1 D2 D5: "DIODE SCHOTTKY 60V 5A SMA", LCSC Par Number=C65009, Manufacturer=MDD, ComponentLink1Description=LCSC, ComponentLink1URL=https://www.lcsc.com/product-detail/Schottky-Barrier-Diodes-SBD_MDD-Microdiode-Electronics-SS56_C65009.html, Iterm Type=Diode, Manufacturer Part Number=SS56
D3: "TVS DIODE 28VWM 45.4VC SMB", Breakdown Voltage=35.8V, Case/Package=SMB, Clamping Voltage=45.4V, Forward Voltage=5V, Leakage Current=5uA, Manufacturer=Diodes, Max Operating Temperature=150°C, Max Output current=13.2A, Max Power Dissipation=600W, Min Breakdown Voltage=31.1V, Min Operating Temperature=-55°C, Package Quantity=3000, Power Line Protection=No, Reverse Standoff Voltage=28V, Supplier Part Number=8797342, Test Current=1mA, Category="TVS Diodes", Clamping Voltage-Max=45.4V, ComponentLink1Description=https://datasheet.ciiva.com/16387/ds19002-16387564.pdf?src-supplier=Future+Electronics, ComponentLink1URL=https://datasheet.ciiva.com/16387/ds19002-16387564.pdf?src-supplier=Future+Electronics, ComponentLink2Description=https://datasheet.ciiva.com/26912/getdatasheetpartid-234000-26912533.pdf?src-supplier=Verical, ComponentLink2URL=https://datasheet.ciiva.com/26912/getdatasheetpartid-234000-26912533.pdf?src-supplier=Verical, Diode Type=ZENER, Direction=Unidirectional, Height=2.62mm, Item Type=Diode, Lead Free="Lead Free", Length=4.57mm, Manufacturer Part Number=SMBJ28A-13-F, Max Breakdown Voltage=35.8V, Max Reverse Leakage Current=5uA, Max Surge Current=13.2A, Mounting Technology="Surface Mount", Number of Elements=1, Number of Unidirectional Channels=1, Packaging="Tape and Reel", Peak Pulse Current=13.2A, Peak Pulse Power=600W, Pins=2, Polarity=Unidirectional, Power Dissipation=600W, Pricing="3000=0.0734, 9000=0.0706, 15000=0.0693, 30000=0.0676, 60000=0.065 (USD)", Radiation Hardening=No, Reverse Breakdown Voltage=31.1V, RoHS=Yes, RoHS Compliant=Yes, Series=SMBJ, Stock=39000, Supplier="Future Electronics", Termination=SMD/SMT, Voltage Rating (DC)=28V, Width=3.9mm, Working Voltage=28V
D4: "DIODE SCHOTTKY 100V 20A D2PAK", LCSC Part Number=C969989, Manufacturer=STMicroelectronics, Supplier Part Number=511-STPS20M100SG-TR, Category="Rectifier Diodes", ComponentLink1Description=https://datasheet.ciiva.com/16356/cd00228904-16356744.pdf?src-supplier=Future+Electronics, ComponentLink1URL=https://datasheet.ciiva.com/16356/cd00228904-16356744.pdf?src-supplier=Future+Electronics, ComponentLink2Description=https://datasheet.ciiva.com/917/cd00228904-917526.pdf?src-supplier=Digikey, ComponentLink2URL=https://datasheet.ciiva.com/917/cd00228904-917526.pdf?src-supplier=Digikey, ComponentLink3Description=https://datasheet.ciiva.com/917/cd00228904-917527.pdf?src-supplier=Digikey, ComponentLink3URL=https://datasheet.ciiva.com/917/cd00228904-917527.pdf?src-supplier=Digikey, Item Type=Diode, Manufacturer Part Number=STPS20M100SG-TR, Pricing="1=2.95, 10=2.48, 50=2.48, 100=2.01, 1000=1.53, 10000=1.38 (USD)", RoHS=Yes, Stock=6295, Supplier=Mouser
J1: "FUSE HOLDER BLADE 80V PCB", Current Rating=30A, LCSC Part Number=C207061, Manufacturer="Littelfuse Wickmann", Supplier Part Number=9883406, Body Material=4896ConductorMaterial, Category="Fuse Holders", ComponentLink1Description=https://datasheet.ciiva.com/295/littelfuse-ato-pcb-fuse-holders-178-6765-295568.pdf?src-supplier=Digikey, ComponentLink1URL=https://datasheet.ciiva.com/295/littelfuse-ato-pcb-fuse-holders-178-6765-295568.pdf?src-supplier=Digikey, ComponentLink2Description=https://datasheet.ciiva.com/4480/flrholder-58019-4480354.pdf?src-supplier=Mouser, ComponentLink2URL=https://datasheet.ciiva.com/4480/flrholder-58019-4480354.pdf?src-supplier=Mouser, ComponentLink3Description=https://datasheet.ciiva.com/16372/flrholder-16372408.pdf?src-supplier=Future+Electronics, ComponentLink3URL=https://datasheet.ciiva.com/16372/flrholder-16372408.pdf?src-supplier=Future+Electronics, ComponentLink4Description=https://datasheet.ciiva.com/15187/getdatasheetpartid-31610-15187861.pdf?src-supplier=Verical, ComponentLink4URL=https://datasheet.ciiva.com/15187/getdatasheetpartid-31610-15187861.pdf?src-supplier=Verical, Item Type="Fuse Holder", Lead Free=5697LeadFree, Manufacturer Part Number=178.6165.0002, Material=4896ConductorMaterial, Pricing="1=2.02, 40=1.96, 125=1.91, 400=1.86, 1250=1.77 (USD)", RoHS=Yes, Stock=3811, Supplier="Future Electronics", Thickness=6mm, Width=17.5mm
J2: "TERM BLK 2P SIDE ENT 5.08MM PCB", LCSC Part Number=C480516, Manufacturer="Phoenix Contact", ComponentLink1Description=https://datasheet.ciiva.com/1120/1697161-1120393.pdf?src-supplier=Farnell, ComponentLink1URL=https://datasheet.ciiva.com/1120/1697161-1120393.pdf?src-supplier=Farnell, ComponentLink2Description=https://datasheet.ciiva.com/832/1715721-832095.pdf?src-supplier=Digikey, ComponentLink2URL=https://datasheet.ciiva.com/832/1715721-832095.pdf?src-supplier=Digikey, ComponentLink3Description=https://datasheet.ciiva.com/15169/getdatasheetpartid-212174-15169929.pdf?src-supplier=Verical, ComponentLink3URL=https://datasheet.ciiva.com/15169/getdatasheetpartid-212174-15169929.pdf?src-supplier=Verical, ComponentLink4Description=https://datasheet.ciiva.com/16046/1715721-16046034.pdf?src-supplier=Onlinecomponents.com, ComponentLink4URL=https://datasheet.ciiva.com/16046/1715721-16046034.pdf?src-supplier=Onlinecomponents.com, Item Type="Terminal Blocks", Manufacturer Part Number=1715721, Pricing="1=0.94 (USD)", RoHS=Yes, Stock=13160, Supplier=Digikey
J3 J4 J6 J7: "3A Straight Square Pins 2.5mm 6P 6mm -40℃~+105℃ 3mm 2.54mm 双排 Black 2x3P 2.54mm Plugin,P=2.54mm Pin Headers ROHS", LCSC Part no=C2685197, Manufacturer=Liansheng, ComponentLink1Description=LCSC, ComponentLink1URL=https://www.lcsc.com/product-detail/Pin-Headers_Liansheng-PH-01291_C2685197.html, Item Type="Male Header", Manufacturer Part Number=PH-01291
J5: "Conn Shrouded Header HDR 5 POS 2.5mm Solder ST Thru-Hole Box", Color=Natural, Contact Resistance=20mR, Current Rating=3A, Flammability Rating="UL94 V-0", Housing Color=White, Insulation Resistance=1GR, LCSC Part Number=C157991, Manufacturer=JST, Max Operating Temperature=85°C, Max Voltage Rating (AC)=250V, Min Operating Temperature=-25°C, Supplier Part Number 1=455-2270-ND, Category="Headers and Wire Housings", ComponentLink1Description=https://datasheet.ciiva.com/26894/getdatasheetpartid-455618-26894798.pdf?src-supplier=Verical, ComponentLink1URL=https://datasheet.ciiva.com/26894/getdatasheetpartid-455618-26894798.pdf?src-supplier=Verical, ComponentLink2Description=https://datasheet.ciiva.com/11746/0900766b8082f55f-11746654.pdf?src-supplier=RSComponents, ComponentLink2URL=https://datasheet.ciiva.com/11746/0900766b8082f55f-11746654.pdf?src-supplier=RSComponents, ComponentLink3Description=https://datasheet.ciiva.com/26894/getdatasheetpartid-640991-26894479.pdf?src-supplier=Verical, ComponentLink3URL=https://datasheet.ciiva.com/26894/getdatasheetpartid-640991-26894479.pdf?src-supplier=Verical, ComponentLink4Description=https://datasheet.ciiva.com/8052/1684882-8052063.pdf?src-supplier=Element14, ComponentLink4URL=https://datasheet.ciiva.com/8052/1684882-8052063.pdf?src-supplier=Element14, ComponentLink5Description=https://datasheet.ciiva.com/20207/523653-20207174.pdf?src-supplier=Rapid+Electronics, ComponentLink5URL=https://datasheet.ciiva.com/20207/523653-20207174.pdf?src-supplier=Rapid+Electronics, ComponentLink6Description=https://datasheet.ciiva.com/724/exh-724390.pdf?src-supplier=Digi-Key, ComponentLink6URL=https://datasheet.ciiva.com/724/exh-724390.pdf?src-supplier=Digi-Key, Connector Type=Header, Contact Finish - Mating=TIN, Contact Material=Brass, Contact Plating=Tin,Lead,Copper, Contact Post Length=0.134inch, Contact Shape=Square, Contact Type="Male Pin", Depth=5.75mm, Fastening Type=Detent, Gender=Male, Housing Material=Polyamide, Insulation Color=Natural, Insulation Height=0.276inch, Insulation Material=Nylon, Item Type="JST Connector", Lead Free="Lead Free", Lead Pitch=2.5mm, Length=14.9mm, Manufacturer Part Number=B5B-XH-A(LF)(SN), Mated Stacking Heights=9.8mm, Max Current Rating=3A, Mount="Through Hole", Number of Contacts=5, Number of Positions=5, Number of Rows=1, Orientation=Straight, Packaging=Bulk, Pitch=2.5mm, Pricing 1="1=0.25000, 10=0.23700, 100=0.16440, 500=0.13914, 1000=0.11383, 5000=0.10119, 10000=0.09170 (USD)", REACH SVHC="No SVHC", RoHS=Yes, Series=XH, Stock 1=1949, Supplier 1=Digi-Key, Termination=Press-Fit, Voltage Rating=250V, Voltage Rating (AC)=250V, Wire/Cable Gauge=22AWG
J8 J9 J10 J11: "1x3P 18A -40℃~+105℃ 250V Black 12~30 Straight pin 5.08mm 2.5 1 3 Plugin,P=5.08mm Screw terminal ROHS", LCSC Part Number=C430602, Manufacturer=DIBO, Package=Plugin,P=5.08mm, ComponentLink1Description=LCSC, ComponentLink1URL=https://www.lcsc.com/product-detail/Screw-terminal_DIBO-DB128L-5-08-3P-BK-S_C430602.html, Item Type="Terminal Block", Manufacturer Part Number=DB128L-5.08-3P-BK-S
K1 K2 K3 K4: "24V 8A One Conversion: 1C (SPDT-Conversion) DIP,10.6x15.7mm Power Relays ROHS", LCSC Part Number=C399482, Manufacturer=HF, Package=DIP,10.6x15.7mm, ComponentLink1Description=LCSC, ComponentLink1URL=https://www.lcsc.com/product-detail/Power-Relays_HF-Xiamen-Hongfa-Electroacoustic-HFD16-24-ZFH-3N_C399482.html, Item Type=Relay, Manufacturer Part Number=HFD16/24-ZFH-3N
L1: library part MWSA1206S-6R8MT, "Fixed Ind 6.8UH 12A 13.5MOHM SMD", LCSC Part Number=C408523, Manufacturer=Sunlord, Item Type=Inductor, Manufacturer Part Number=MWSA1206S-6R8MT, Pricing="1=1.68, 10=1.302, 25=1.1772, 50=1.0908, 100=1.0103, 250=0.91272 (USD)", RoHS=No, Stock=495, Supplier=Digikey
L2: library part FEXL1010A-150M, "13.8A 15uH Integrated molded inductor ±20% 15.5A SMD,11.9x11mm Power Inductors ROHS", LCSC Part Number=C5378579, Manufacturer=cjiang, Package=SMD,11.9x11mm, ComponentLink1Description=LCSC, ComponentLink1URL=https://www.lcsc.com/product-detail/Power-Inductors_cjiang-Changjiang-Microelectronics-Tech-FEXL1010A-150M_C5378579.html, Item Type=Inductor, Manufacturer Part Number=FEXL1010A-150M
LED1 LED2 LED3: library part NCD0603R3, "RED LED 0603 Light Emitting Diodes", LCSC Part Number=C3151730, Manufacturer="Foshan NationStar Optoelectronics", Package=0603, ComponentLink1Description=LCSC, ComponentLink1URL=https://www.lcsc.com/product-detail/Light-Emitting-Diodes-LED_Foshan-NationStar-Optoelectronics-NCD0603R3_C3151730.html, Item Type=LED, Manufacturer Part Number=NCD0603R3
LED4 LED5 LED6 LED7: library part NCD0603B3, "blue 0603 Light Emitting Diodes (LED) ROHS", LCSC Part Number=C158101, Manufacturer="Foshan NationStar Optoelectronics", Package=0603, ComponentLink1Description=LCSC, ComponentLink1URL=https://www.lcsc.com/product-detail/Light-Emitting-Diodes-LED_Foshan-NationStar-Optoelectronics-NCD0603B3_C158101.html, Item Type=LED, Manufacturer Part Number=NCD0603B3
Q1: "MOSFET N-CH 100V 15A 8VSON", Drain to Source Breakdown Voltage=100V, Drain to Source Resistance=49mR, Gate to Source Voltage (Vgs)=20V, LCSC Part Number=C478471, Manufacturer="Texas Instruments", Power Dissipation=2.8W, ComponentLink1Description=http://www.ti.com/lit/ds/symlink/csd19538q3a.pdf?src-supplier=Digikey, ComponentLink1URL=http://www.ti.com/lit/ds/symlink/csd19538q3a.pdf?src-supplier=Digikey, Height=900um, Item Type=IC, Lead Free=5697LeadFree, Length=3.3mm, Manufacturer Part Number=CSD19538Q3A, Number of Channels=1NUMBER, Pricing="1=0.57, 10=0.496, 50=0.496, 100=0.343, 1000=0.244, 10000=0.19 (USD)", RoHS=Yes, Stock=14931, Supplier=Mouser, Thickness=800um, Turn-Off Delay Time=7ns, Turn-On Delay Time=5ns, Width=3.3mm
R1: library part RC0402FR-077K5L, "RES 7.5K OHM 1% 1/16W 0402", Case Code (Imperial)=0402, Case Code (Metric)=1005, LCSC Part Number=C137934, Manufacturer=Yageo, Max Operating Temperature=155°C, Max Power Dissipation=63mW, Min Operating Temperature=-55°C, Package Quantity=1, Resistance=7.5kR, Resistance Tolerance=1%, Resistor Type="Thick Film", Supplier Part Number 1=311-7.50KLRCT-ND, Temperature Coefficient=100ppm/°C, Voltage Rating=50V, Case/Package=0402, Category="Chip SMD Resistors", ComponentLink1Description=https://datasheet.ciiva.com/7850/1018594-7850095.pdf?src-supplier=Element14, ComponentLink1URL=https://datasheet.ciiva.com/7850/1018594-7850095.pdf?src-supplier=Element14, ComponentLink2Description=https://datasheet.ciiva.com/7983/1018594-7983527.pdf?src-supplier=Element14, ComponentLink2URL=https://datasheet.ciiva.com/7983/1018594-7983527.pdf?src-supplier=Element14, ComponentLink3Description=https://datasheet.ciiva.com/46394/1018594-46394939.pdf?src-supplier=Element14, ComponentLink3URL=https://datasheet.ciiva.com/46394/1018594-46394939.pdf?src-supplier=Element14, ComponentLink4Description=https://datasheet.ciiva.com/2519/pyu-r-int-thick-7-2519058.pdf?src-supplier=Digi-Key, ComponentLink4URL=https://datasheet.ciiva.com/2519/pyu-r-int-thick-7-2519058.pdf?src-supplier=Digi-Key, ComponentLink5Description=https://datasheet.ciiva.com/2519/pyu-r-int-thick-7-2519059.pdf?src-supplier=Digi-Key, ComponentLink5URL=https://datasheet.ciiva.com/2519/pyu-r-int-thick-7-2519059.pdf?src-supplier=Digi-Key, ComponentLink6Description=https://datasheet.ciiva.com/2519/pyu-r-int-thick-7-2519057.pdf?src-supplier=Digi-Key, ComponentLink6URL=https://datasheet.ciiva.com/2519/pyu-r-int-thick-7-2519057.pdf?src-supplier=Digi-Key, ComponentLink7Description=https://datasheet.ciiva.com/12667/pyu-rc0402-51-rohs-l-6-r-12667366.pdf?src-supplier=Mouser, ComponentLink7URL=https://datasheet.ciiva.com/12667/pyu-rc0402-51-rohs-l-6-r-12667366.pdf?src-supplier=Mouser, ComponentLink8Description=https://datasheet.ciiva.com/16741/pyu-rc0402-51-rohs-l-6-r-16741132.pdf?src-supplier=Future+Electronics, ComponentLink8URL=https://datasheet.ciiva.com/16741/pyu-rc0402-51-rohs-l-6-r-16741132.pdf?src-supplier=Future+Electronics, ComponentLink9Description=https://datasheet.ciiva.com/15189/getdatasheetpartid-330684-15189510.pdf?src-supplier=Verical, ComponentLink9URL=https://datasheet.ciiva.com/15189/getdatasheetpartid-330684-15189510.pdf?src-supplier=Verical, Construction=Rectangular, Depth=0.5mm, Features="Moisture Resistant", Height=0.016inch, Item Type=Resistor, Lead Free="Lead Free", Length=0.039inch, Manufacturer Part Number=RC0402FR-077K5L, Military Standard=Not, Number of Terminations=2, Packaging="Tape and Reel", Power Rating=63mW, Pricing 1="1=0.10000, 10=0.01400, 100=0.00580, 1000=0.00262, 2500=0.00228, 5000=0.00188 (USD)", RoHS=Yes, RoHS Compliant=Yes, Series=RC, Size Code=0402, Stock 1=1313734, Supplier 1=Digi-Key, Termination=SMD/SMT, Tolerance=1%, Voltage Rating (DC)=50V, Width=0.02inch
R2: library part RT0402BRD0720KL, "RES SMD 20K OHM 0.1% 1/16W 0402", Case Code (Imperial)=0402, Case Code (Metric)=1005, LCSC Part Number=C705630, Manufacturer=Yageo, Max Operating Temperature=125°C, Max Power Dissipation=63mW, Min Operating Temperature=-55°C, Package Quantity=10000, Power Rating=62.5mW, Supplier Part Number=YAG1388CT-ND, Temperature Coefficient=25ppm/°C, Tolerance=0.1%, Voltage Rating=50V, Case/Package=0402, Category="Chip SMD Resistors", ComponentLink1Description=https://datasheet.ciiva.com/8890/pyu-rt-1-to-0-05-rohs-l-4-8890380.pdf?src-supplier=Avnet, ComponentLink1URL=https://datasheet.ciiva.com/8890/pyu-rt-1-to-0-05-rohs-l-4-8890380.pdf?src-supplier=Avnet, Contact Plating=Tin,Matte, Features="Moisture Resistant", Height=0.014inch, Item Type=Resistor, Lead Free="Lead Free", Length=0.039inch, Manufacturer Part Number=RT0402BRD0720KL, Number of Terminations=2, Packaging="Tape and Reel", Pricing="1=0.16, 10=0.121, 50=0.0958, 100=0.0859, 500=0.0654, 1000=0.0578, 5000=0.04283 (USD)", RoHS=Yes, RoHS Compliant=Yes, Series=RT, Stock=80617, Supplier=Digikey, Termination=SMD/SMT, Voltage Rating (DC)=50V, Weight=2.3E-05oz, Width=0.5mm